# Altium PCB V3_Board.PcbDoc (part 5 of 7)
Units mil, origin at the board's own origin, x right, y up, seen from the top; angles counter-clockwise.
Board outline 6915 x 4422 mil, 2 copper layers (Top Layer, Bottom Layer), stack 57 mil thick; 364 components, 243 nets, 1048 pads, 599 vias.
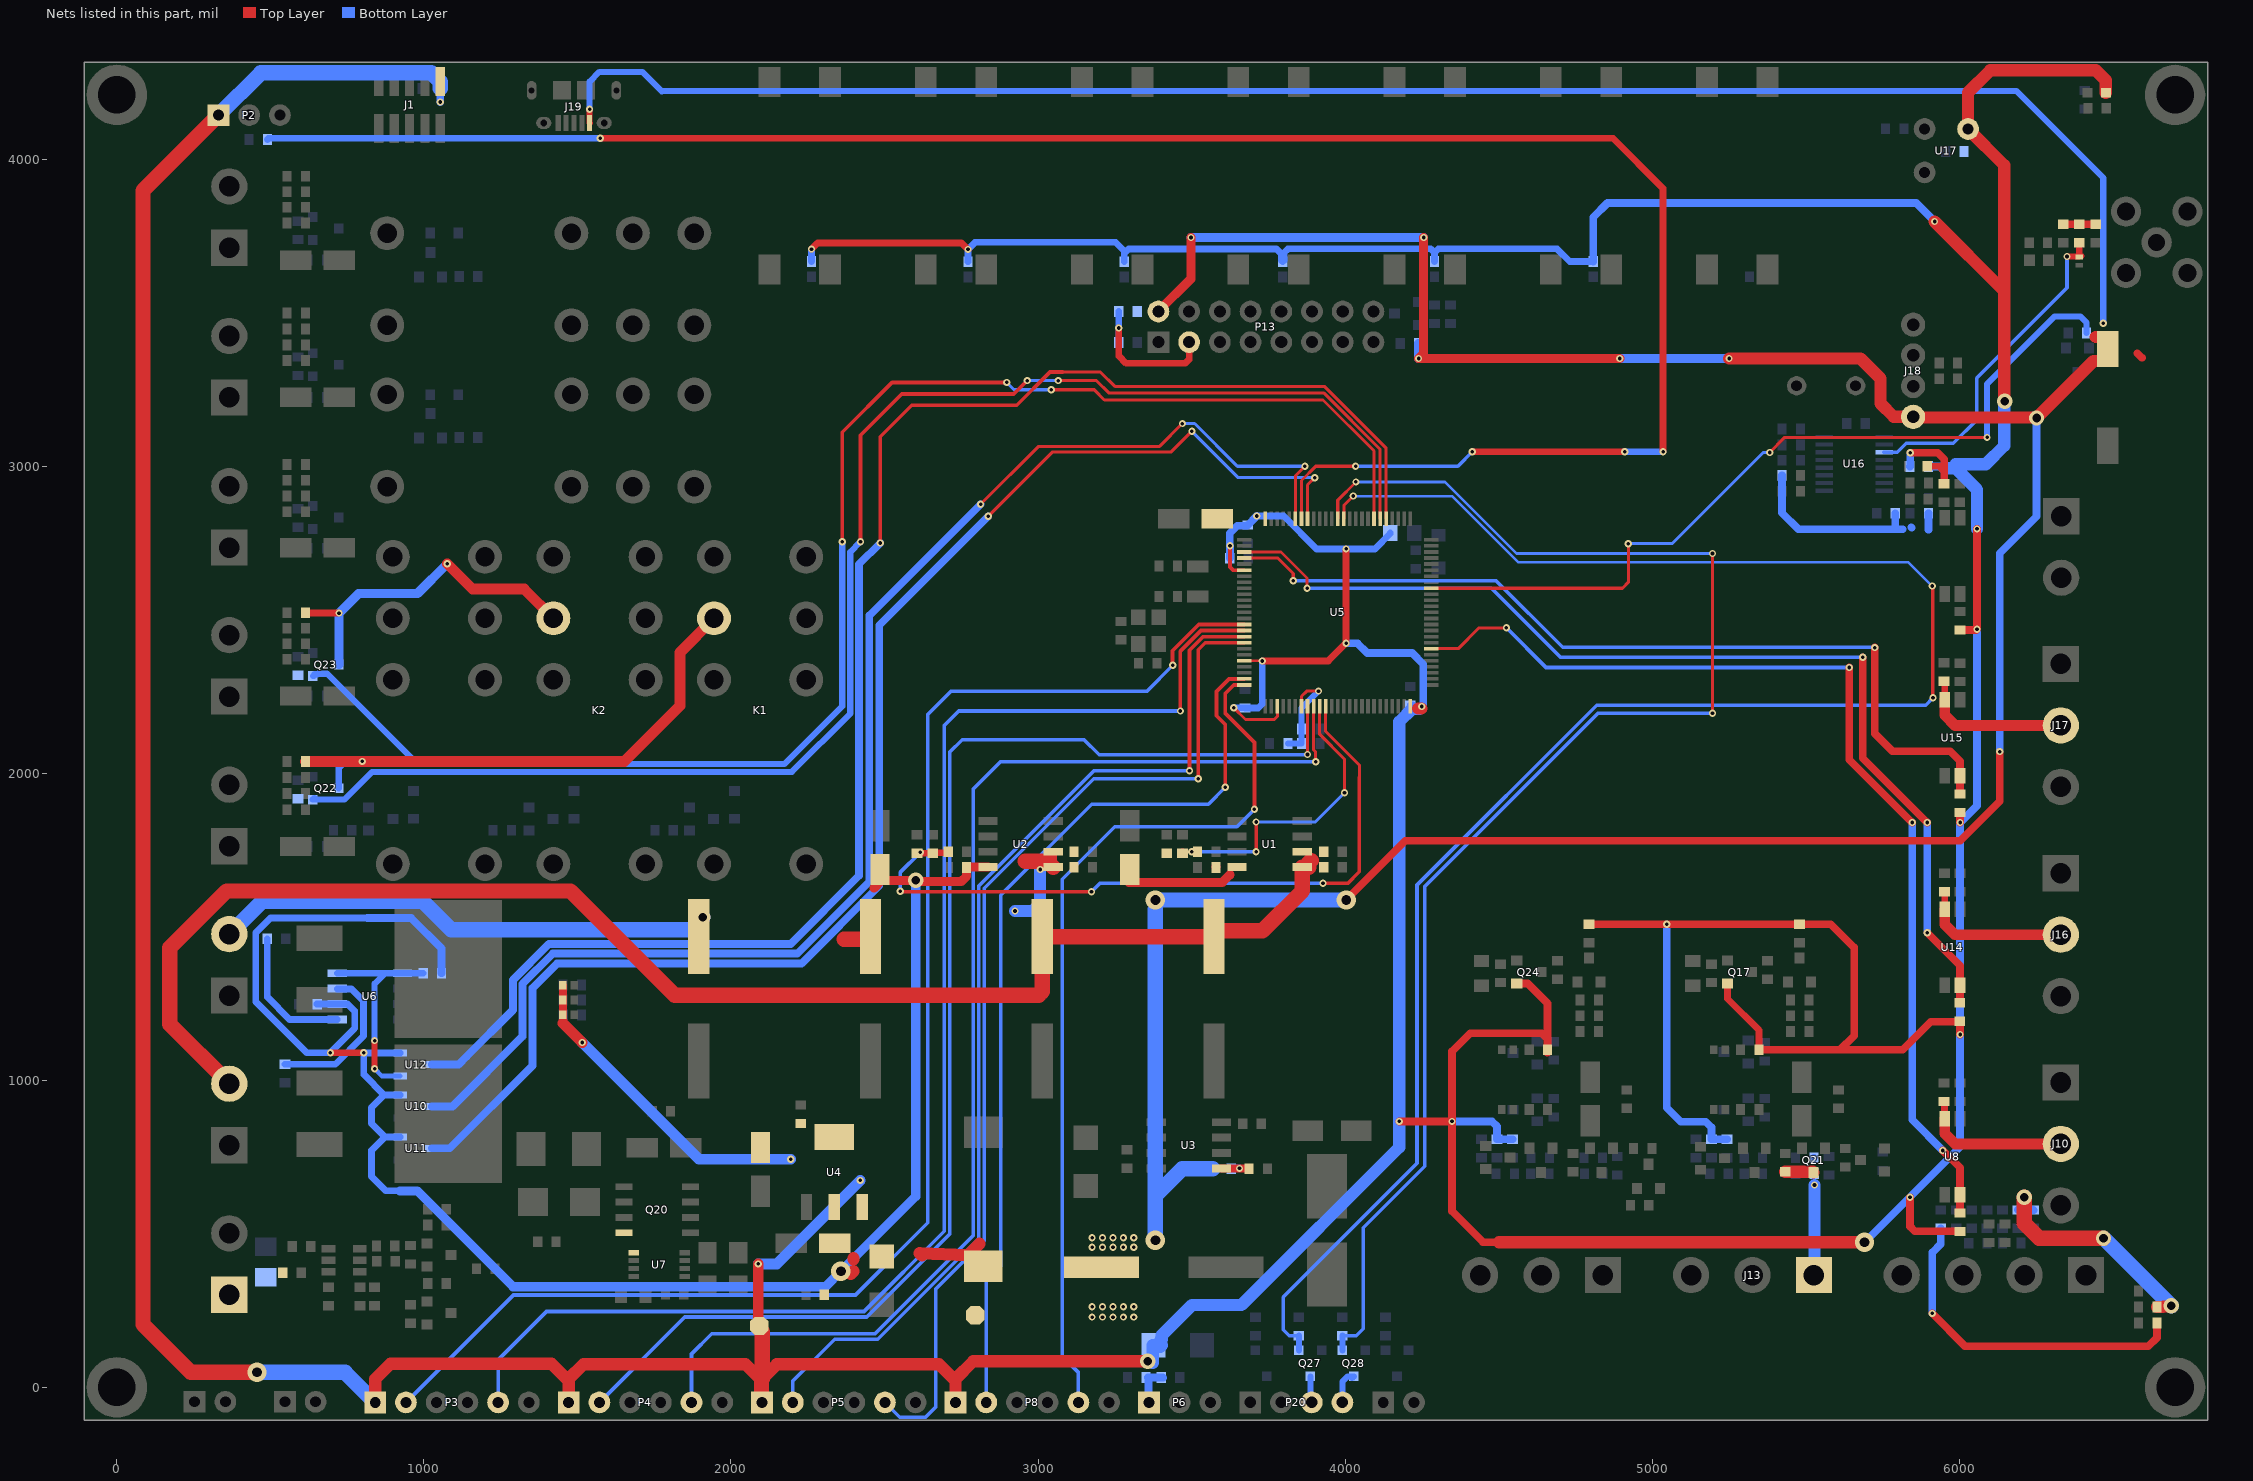
[diagram p2: the nets of this part, all layers, seen from the top]

## Via types
v1: diameter 23.62, hole 11.81, Top Layer to Bottom Layer, 557 vias
v2: diameter 62.99, hole 31.5, Top Layer to Bottom Layer, 31 vias
v3: diameter 50, hole 28, Top Layer to Bottom Layer, 11 vias

## Nets (pads, with @x,y where several pads share a name; then routed paths per layer and width w, separated by ;. In a path a pad name is that pad's centre, name@x,y a point inside that pad or via, vN(x,y) a via of type N, cw(c..) or ccw(c..) an arc to the next point about the centre after c; other vN are vias at no path point) (continued)
3V3: (continued)
  Bottom Layer w25: v1(1054,4186) C51.1@1054,4230 ; P6.1@3357.14,-49.83 3359.64,-47.33 3359.64,31.67 3358.14,33.17 R31.2@3401.14,33.17 3406.14,33.17 R31.2@3407.14,32.17 ; C30.1@3624.46,2700.8 3625,2701.34 v1(3625,2741) ; v1@3624.46,2741 3624.46,2781.46 3649.23,2806.23 3680.15,2806.23 C28.1@3682.46,2808.54 ; C28.1@3682.54,2808.54 v1(3712,2838) ; v1(4003,2424) 4039.87,2424 4071.87,2392 4218,2392 4254.5,2355.5 4254.5,2223.5 v1(4249,2218) ; v1(4348,867) 4477.86,867 4494.5,850.36 C49.1@4494.5,809 R45.2@4545,809 ; R66.2@4807.74,3666.9 4807.74,3669.15 4807.74,3810.74 4854,3857 5859,3857 v1(5919,3797) ; v1(5047,1509) 5047,912 5093,866 5174,866 5192.5,847.5 C48.1@5192.5,809 R43.2@5243,809 ; R104.2@5422,2971 R104.2@5422,2969.67 5422,2849 5476,2795 5815,2795 ; v2(5691,474) 6002,785 v1(6002,1150) v1(6002,1840) 6057,1895 v1(6057,2469) ; 5791,2796 R55.2@5791,2847 ; 5843.5,2801 5845,2799.5 ; 5899,2793 C75.2@5899,2847 ; R54.2@5899,2999 5952.5,2999
  Bottom Layer w35: v1(1516,1124) 1896,744 v1(2195,744) ; v1(2089,403) 2149,403 v1(2421,675)
  Bottom Layer w40: v3@3373.64,81.17 3373.64,138.17 D3.2@3376.4,138.17 D3.2@3380.64,138.17 ; D3.2@3398.01,133.78 D3.2@3402.4,138.17 ; D3.2@3399.64,157.17 3403.14,157.17 3403.14,171.14 3501.12,269.12 3662.12,269.12 4176,783 v1(4176,867) 4176,2168.34 4217.66,2210 v1@4241,2210 ; 5952.5,2994 5987,2994 6057,2924 v1(6057,2796) ; 5987,3007 6086,3007 6146,3067 v3@6146,3212
  Bottom Layer w50: P2.1@331.83,4143.14 469.69,4281 1024.71,4281 1054,4251.71 C51.1@1054,4230 ; v2(457,50) 744.31,50 P3.1@842.14,-47.83
  other v3: 6147,3212
3V3#: C50.1 R54.1 SB17.1 | length 306.2
  Top Layer w22: SB17.1@5895,3000 5933,3000 5950,2983
  Top Layer w25: v1(5840,3044) 5929,3044 5950,3023 5950,2983 C50.1@5950,2943
  Bottom Layer w25: R54.1@5839,2999 5840,3000 v1(5840,3044)
4-20mA: R103.1 R110.1 SB35.1 | length 822.5
  Top Layer w39.37: SB35.1@6643,263 6662.68,263 6664.65,264.97 6686.97,264.97 v3(6689,267)
  Top Layer w50: v3(6211,620) 6211,535 6259,487 v3(6469,487)
  Bottom Layer w25: v3@6211,619.23 6211,599.33 6195.67,584 6195.67,581.5 6193.17,579 R110.1@6190.67,579 6191.17,578.5 6240.5,578.5 R103.1@6241,578
  Bottom Layer w50: v3(6469,487) v3(6689,267)
5V: C4.1 C6.1 C16.1 C17.1 C18.1 C21.1 C22.1 C55.1 D2.1 J18.4 J19.1 L2.2 LS1.1 P7.1 P13.2 R1.1 R57.2 R58.1 R85.2 U1.8 U2.8 U4.3 U6.6 U10.5 U11.5 U12.5 | length 21732.8
  Top Layer w20: v1(1540,4162) 1540,4118.09 J19.1@1540.39,4117.7
  Top Layer w22: v1(696.14,1090.17) v1(805.14,1090.17)
  Top Layer w25: v2(4003,1588) 4196,1781 6003,1781 6131,1909 v1(6131,2071) ; 6579,3368 6594,3353
  Top Layer w29.53: 2466,1627 2491,1652 v3(2602,1652) 2605.92,1648.08 2749.99,1648.08 2767.29,1665.38 2767.29,1693.66 C18.1@2767.52,1693.89 ; C18.1@2768.76,1694.89 U2.8@2836.93,1694.89 ; C4.1@3296,1645 3599.74,1645 3624.74,1670 ; C4.1@3298.52,1687.24 3298.52,1667.56 C4.1@3315.26,1650.83 ; P13.2@3392,3504 3498,3610 v1(3498,3745) ; C6.1@3579.52,1694.66 C6.1@3579.76,1694.89 ; v1(4255.49,3744.7) 4255.49,3367.49 v1(4239,3351) v1(4894,3351)
  Top Layer w40: 2390.14,370.17 2399.14,379.17 ; 2399.14,418.17 2399.14,421.17 ; 2622.2,430.51 2615.31,437.4 2771.93,431.49 2809.33,468.9 ; v1(5250,3351) 5678,3351 5743,3286 5743,3204 5786,3161 J18.4@5849,3161 ; J18.4@5850,3160 5851.09,3158.91 6249.09,3158.91 v3(6251,3157) ; v3@6252.91,3158.91 6436.6,3342.6 6467.71,3342.6 6483.14,3358.03 LS1.1@6483.14,3381.65 6483.14,3405.27 6467.71,3420.71 6444.09,3420.71
  Bottom Layer w20: v1(1540,4162) 1540,4252 1572,4284 1712,4284 1774.77,4221.23 ; 1775,4221 1774.77,4221.23 ; v1(6468,3466) 6468,3939 6185.77,4221.23 1774.77,4221.23
  Bottom Layer w22: C55.1@651.54,1249.17 U6.6@718.54,1249.17 752.14,1249.17 775.14,1226.17 775.14,1170.17 v1@696.64,1091.67 ; v1(696.14,1090.17) 619.83,1090.17 453,1257 453,1481 501,1529 817,1529 ; v1(805.14,1090.17) v1@805.14,1089.57 ; 923,641 877,641 830,688 830,772.83 873.74,816.57 ; U11.5@923.96,816.57 873.74,816.57 ; U10.5@923.96,953.07 871.14,953.07 ; U12.5@923.96,1089.57 v1@805.14,1089.57 ; v1@805.14,1089.57 805.14,1019.07 871.14,953.07 ; 871.14,953.07 830.14,912.07 830.14,860.17 873.74,816.57
  Bottom Layer w25: 817,1529 959,1529 1058.14,1429.86 R85.2@1058.14,1349.17 ; v1(6131,2071) 6131,2717 6251,2837 v3(6251,3157)
  Bottom Layer w29.53: 923,641 979,641 1291.24,328.76 2308.06,328.76 v2(2358.29,379) 2602,622.71 v3(2602,1652) ; v1(3498,3745) 4255.19,3745 v1(4255.49,3744.7) ; v1(4239,3351) R57.2@4239,3400 ; v1(4894,3351) v1(5250,3351)
  Bottom Layer w50: v2(3382.22,480) 3382.22,625.22 ; v2@3382.22,1557 3382.22,625.22 ; v2(3382.22,1588) v2(4003,1588) ; R1.1@3569,713 3470,713 3382.22,625.22
  other v1: 3176,230 3210,230 3244,230 3278,230 3312,230 3176,264 3210,264 3244,264 3278,264 3312,264 3176,457 3210,457 3244,457 3278,457 3312,457 3176,488 3210,488 3244,488 3278,488 3312,488
_ADC: C36.1 R12.2 R13.2 U5.32 | length 331.9
  Top Layer w10: U5.32@3857.76,2219.04 3857.76,2250.76 3875,2268 v1(3913,2268)
  Bottom Layer w20: R12.2@3814,2097 C36.1@3858,2097 3858,2213 v1(3913,2268)
ADC_14: P4.2 U5.33 | length 4296.7
  Top Layer w10: v1(3877.44,2061.62) U5.33@3877.44,2219.04
  Bottom Layer w12: P4.2@1571.89,-47.83 1849.72,230 2442.71,230 2713,500.29 2713,2070 2753,2110 3150,2110 3199.38,2060.62 v1@3877.44,2060.62
ADC_15: P4.5 U5.34 | length 4023.8
  Top Layer w10: U5.34@3897.13,2219.04 3897.13,2076.87 3904,2070 v1(3904,2037.81)
  Bottom Layer w12: P4.5@1871.89,-47.83 1871.89,109.89 1938,176 2469.32,176 2789,495.68 2789,1949 2877.81,2037.81 v1(3904,2037.81)
AN1: P8.2 U5.24 | length 2978.1
  Top Layer w12: v1(3609.84,1955.19) 3609.84,2159.16 3581,2188 3581,2267 3621.62,2307.62 U5.24@3670.75,2307.62
  Bottom Layer w12: P8.2@2831.39,-47.83 2831.39,348.39 2879,396 2879,1603.81 3175.19,1900 3554.65,1900 v1(3609.84,1955.19)
AN2: P8.5 U5.25 | length 2933.6
  Top Layer w12: U5.25@3670.75,2287.94 3636.94,2287.94 3610,2261 3610,2195 3704.5,2100.5 v1(3704.5,1883)
  Bottom Layer w12: P8.5@3131.39,-47.83 3131.39,49.61 3079,102 3079,1655.09 3249.91,1826 3647.5,1826 v1(3704.5,1883)
AN10: P3.2 U5.15 | length 4776.5
  Top Layer w12: v1(3439,2351.81) 3438,2352.81 3438,2399.61 3523.18,2484.79 U5.15@3670.75,2484.79
  Bottom Layer w12: P3.2@942.14,-47.83 1291.97,302 2405.97,302 2641,537.03 2641,2192 2716,2267 3354.19,2267 v1(3439,2351.81)
AN11: P3.5 U5.16 | length 4629.4
  Top Layer w12: v1(3463.5,2203) 3463.5,2398.24 3530.36,2465.1 U5.16@3670.75,2465.1
  Bottom Layer w12: P3.5@1242.14,-47.83 1242.14,90.17 1399.97,248 2433.84,248 2695,509.16 2695,2156 2742,2203 v1(3463.5,2203)
AN12: P5.2 U5.17 | length 3443.9
  Top Layer w12: v1(3493,2009) 3493,2400.87 3537.55,2445.42 U5.17@3670.75,2445.42
  Bottom Layer w12: P5.2@2201.64,-47.83 2201.64,21.67 2337.97,158 2478.19,158 2807,486.81 2807,1633.63 3182.37,2009 v1(3493,2009)
AN13: P5.5 U5.18 | length 3376.2
  Top Layer w12: v1(3521.37,1983) 3521.37,2402.37 3544.73,2425.73 U5.18@3670.75,2425.73
  Bottom Layer w12: P5.5@2501.64,-47.83 2549.81,-96 2634,-96 2667,-63 2667,321.36 2825,479.36 2825,1626.18 3181.82,1983 v1(3521.37,1983)
ANT: C74.1 L3.1 U16.3 | length 1063.8
  Top Layer w20: v1(6350,3683) 6350.61,3682.39 L3.1@6388.19,3682.39 ; 6390,3708 6390,3691 L3.1@6396.58,3684.42
  Bottom Layer w12: U16.3@5754.44,3045.5 5797.5,3045.5 5827,3075 5980,3075 6056,3151 6056,3287 6350,3581 v1(6350,3683)
ANT#: C74.2 SB4.1 SB16.2 | length 106
  Top Layer w25: SB16.2@6338,3788 C74.2@6390,3788 SB4.1@6444,3788
AUTO_FILL: K1.6 Q22.3 SB12.1 | length 1775.5
  Top Layer w35: SB12.1@614.84,2039 v1(799.5,2039) 1653,2039 1834,2220 1834,2394 K1.6@1945,2505
  Bottom Layer w22: Q22.3@723.18,1952.17 723.18,2017.18 745,2039 v1(799.5,2039)
AUTO_FLUSH: K2.6 Q23.3 SB21.1 | length 1114.6
  Top Layer w22: SB21.1@615.84,2522 v1(724,2522)
  Top Layer w35: v1(1077,2683) 1160,2600 1327.25,2600 K2.6@1422.25,2505
  Bottom Layer w22: Q23.3@723.65,2354.4 Q23.3@723.82,2354.58 ; v1@723.82,2521.82 v1(724,2522)
  Bottom Layer w30: Q23.3@723.82,2354.58 v1@723.82,2521.82 ; v1(724,2522) 788,2586 980,2586 v1(1077,2683)
AUX_HEATER: C60.2 J13.1 Q21.3 R67.1 SB8.2 | length 478.4
  Top Layer w25: SB8.2@5434.13,701.87 Q21.3@5525,700.74
  Top Layer w40: SB8.2@5433,703 5522.74,703 Q21.3@5525,700.74
  Bottom Layer w22: J13.1@5526.17,366.64 J13.1@5528,368.46 ; C60.2@5526.17,750.05 C60.2@5526.5,749.72
  Bottom Layer w40: J13.1@5528,368.46 v1(5528,660)
B_CNTRL: Q28.1 R75.1 U5.88 | length 4740.6
  Top Layer w10: U5.88@3975.87,2829.28 3975.87,2889.87 v1(4035,2949) ; v1(5196,2196) v1(5196,2716)
  Bottom Layer w10: v1(4035,2949) 4325,2949 4558,2716 v1(5196,2716)
  Bottom Layer w12: R75.1@3990.73,169.17 4036.17,169.17 4059,192 4059,520.64 4259,720.64 4259,1632 4823,2196 v1(5196,2196)
  Bottom Layer w20: Q28.1@3990.73,121.5 R75.1@3990.73,169.17
B_GND: P20.4 Q28.3 | length 119.6
  Bottom Layer w20: P20.4@3991.14,-47.83 3991.14,19.39 4008.6,36.85 Q28.3@4028.13,36.85 Q28.3@4022.39,31.1
BAT: C2.2 J2.1 SB1.2
BOOT0: R16.1 U5.94 | length 6810.9
  Top Layer w10: U5.94@3857.76,2829.28 3857.76,2953.76 3904,3000 v1(4034,3000)
  Top Layer w22: v1(1575,4067.81) 4872.19,4067.81 5035,3905 v1(5035,3047) ; v1(4414,3047) v1(4910,3047)
  Bottom Layer w12: v1(4034,3000) 4367,3000 v1(4414,3047)
  Bottom Layer w22: R16.1@491,4064 494.81,4067.81 v1@1574.56,4067.81 ; v1(4910,3047) v1(5035,3047)
BUZZER: R62.2 U5.67 | length 2709.7
  Top Layer w10: U5.67@4280.99,2602.9 4902.9,2602.9 4922,2622 v1@4922,2740 ; v1(5382,3045) 5431,3094 v1(6090,3094)
  Bottom Layer w10: v1(4922,2748) 5064,2748 5361,3045 v1(5382,3045)
  Bottom Layer w20: v1(6090,3094) 6090,3268 6310,3488 6394,3488 6413.54,3468.46 6413.54,3434.46 R62.2@6414,3434
CII: R1.2 R2.2 U3.5 | length 117.3
  Top Layer w25: U3.5@3597.59,714.09 3597.89,713.8 3686.2,713.8 R2.2@3687,713
  Bottom Layer w25: R1.2@3629,713 3630,714 v1(3656,714)
CRNT_SNS.IP+_1: C5.1 C7.1 C8.1 C10.1 J3.2 U1.1 U1.2 | length 4788.5
  Top Layer w50: J3.2@366.94,989.62 173,1183.56 173,1432 358.17,1617.17 1477.83,1617.17 1817,1278 3002,1278 3013.89,1289.89 C7.1@3013.89,1468.72 C5.1@3573.22,1468.72 3573.22,1478.3 3582.67,1487.75 3730.75,1487.75 3860.52,1617.52 U1.1@3860.52,1694.89 ; U1.1@3882,1694.89 3882,1709.45 3889,1716.45
  Bottom Layer w22: J3.2@358.69,989.62 J3.2@366.94,989.62
CRNT_SNS.IP+_2: C12.1 C13.1 C14.1 C15.1 J4.2 U2.1 U2.2 | length 2079.6
  Top Layer w25: U2.1@3049.52,1694.89 U2.2@3049.52,1744.89
  Top Layer w50: 2368.5,1459.5 C13.1@2454.56,1459.5 ; 2958.29,1714.51 3029.91,1714.51 U2.1@3049.52,1694.89
  Bottom Layer w39.37: v1(2925,1552) 2983,1552 3007,1576 v1(3007,1687)
  Bottom Layer w50: J4.2@366.94,1476.67 473.27,1583 998,1583 1090,1491 1868,1491 v3(1909,1532)
CRNT_VOUT.VIOUT1: C11.1 R5.1 R7.2 U5.35 | length 952.4
  Top Layer w10: U5.35@3916.81,2219.04 3916.81,2127.19 3998,2046 v1(3998,1937)
  Top Layer w12: v1(3710,1744.89) v1(3710,1842)
  Top Layer w29.53: C11.1@3470.31,1740.11 C11.1@3470.54,1740.35 ; R5.1@3519.52,1742.39 R5.1@3519.52,1744.89
  Bottom Layer w10: v1(3710,1842) 3903,1842 v1(3998,1937)
  Bottom Layer w12: v1(3500.52,1744.89) v1(3710,1744.89)
CRNT_VOUT.VIOUT2: C19.1 R8.1 R10.2 U5.36 | length 2363.8
  Top Layer w10: U5.36@3936.5,2219.04 3936.5,2136.61 4046,2027.11 4046,1988
  Top Layer w12: v1(2551.81,1616) 2552.81,1615 v1(3174.3,1615) ; v1(3928,1642) 4008,1642 4046,1680 4046,1988
  Top Layer w22: R10.2@2606.31,1740.11 C19.1@2657.31,1740.11 2659.14,1741.95 2704.58,1741.95 R8.1@2707.52,1744.89
  Bottom Layer w12: v1(2551.81,1616) 2551,1616.81 2551,1677 v1(2617,1743) ; v1(3174.3,1615) 3201.3,1642 v1(3928,1642)
DIV: P13.3 R58.2 R59.2 | length 492.4
  Top Layer w22: v1(3263,3450) 3263,3359 3287,3335 3479.11,3335 3492,3347.89 P13.3@3492,3404
  Bottom Layer w22: R59.2@3263,3403 R58.2@3263,3504
DRV_OUTA1: R24.2 U6.7 | length 510.1
  Bottom Layer w22: R24.2@548.14,1053.17 712.14,1053.17 804.14,1145.17 804.14,1258.86 764.67,1298.33 719.38,1298.33 U6.7@718.54,1299.17
DRV_OUTB1: R25.2 U6.5 | length 448.2
  Bottom Layer w22: R25.2@490.82,1462.06 490.82,1271.5 563.14,1199.17 U6.5@718.54,1199.17
ENA: U5.80 U12.2 | length 5227.2
  Top Layer w10: 3081,3307 3203,3307 3250,3260 3932,3260 4133.35,3058.65 U5.80@4133.35,2829.28
  Top Layer w12: v1(2486,2750) 2486,3096 2589,3199 2931,3199 3039,3307 3081,3307
  Bottom Layer w25: U12.2@1026.32,1052.17 1113.17,1052.17 1139.59,1078.59 1290.68,1229.68 1290.68,1327.48 1407.7,1444.5 2194.5,1444.5 2417,1667 2417,2681 v1(2486,2750)
ENA#: R85.1 U6.1 U6.8 U12.4 | length 698.2
  Top Layer w20: v1(840.14,1038.17) v1(840.14,1130.17)
  Bottom Layer w15: v1(840.14,1038.17) 863.54,1014.77 U12.4@923.96,1014.77
  Bottom Layer w20: v1(840.14,1130.17) 840.14,1315.14 874.17,1349.17
  Bottom Layer w22: U6.8@718.54,1349.17 874.17,1349.17 U6.1@931.14,1349.17 R85.1@998.14,1349.17
FILL_CNTRL: Q22.1 R69.1 U5.81 | length 4878.4
  Top Layer w10: v1(3066,3279) 3190,3279 3230,3239 3930,3239 4113.66,3055.34 U5.81@4113.66,2829.28
  Top Layer w12: v1(2422,2754) 2422,3101 2556,3235 2920.66,3235 v1(2964.66,3279)
  Bottom Layer w10: v1(2964.66,3279) v1(3066,3279)
  Bottom Layer w20: Q22.1@644.28,1920.51 Q22.1@638.54,1914.76 742,1914.76 832.23,2005 2199,2005 2388.5,2194.5 2388.5,2720.5 v1(2422,2754)
FLOW_MCU1: R76.1 U5.57 U8.4 | length 3358.1
  Top Layer w10: U5.57@4280.99,2406.05 4368.05,2406.05 4436,2474 v1(4525,2474)
  Top Layer w25: v1(5641,2345) 5641,2045 v1(5846,1840) ; v1(5945.58,772.42) 6002,716 U8.4@6002,627.98 R76.1@6002,570
  Bottom Layer w12: v1(4525,2474) 4654,2345 v1@5633,2345
  Bottom Layer w25: v1(5846,1840) 5846,872 v1(5945.58,772.42)
FLOW_MCU2: R35.1 U5.3 U14.4 | length 3433
  Top Layer w10: U5.3@3670.75,2721.01 3790.99,2721.01 3876,2636 v1(3876,2603)
  Top Layer w25: v1(5685,2378) 5685,2050 v1(5895,1840) ; v1(5895,1481) 6002,1374 U14.4@6002,1309.98 R35.1@6002,1252
  Bottom Layer w12: v1(3876,2603) 4476,2603 4701,2378 v1(5685,2378)
  Bottom Layer w25: v1(5895,1481) v1(5895,1840)
FLOW_MCU3: R23.1 U5.4 U15.4 | length 2886.3
  Top Layer w10: U5.4@3670.75,2701.32 3780.68,2701.32 3831,2651 v1(3831,2627.58)
  Top Layer w25: v1(5724,2409.69) 5724,2130 5782,2072 5970,2072 6002,2040 U15.4@6002,1991.98 R23.1@6002,1934
  Bottom Layer w12: v1@3831.58,2627.58 4491.42,2627.58 4708,2411 v1@5722.69,2411
FLOW_OUT1: J10.2 R77.1 U8.2 | length 497
  Top Layer w22: R77.1@5950,932 5951,931 5951,877.02 U8.2@5952,876.02
  Top Layer w35: U8.2@5952,876.02 5952.22,875.8 5952.22,827.78 5986.33,793.67 J10.2@6330,793.67
FLOW_OUT2: J16.2 R36.1 U14.2 | length 497.6
  Top Layer w22: U14.2@5952,1558.02 R36.1@5952,1614
  Top Layer w35: U14.2@5952.22,1558.47 5952.22,1508.45 5985.67,1475 J16.2@6330,1475
FLOW_OUT3: J17.2 R38.1 U15.2 | length 497.9
  Top Layer w22: U15.2@5952,2240.02 R38.1@5952,2296
  Top Layer w35: U15.2@5952,2240.02 5952.22,2239.8 5952.22,2189.78 5985.67,2156.33 J17.2@6330,2156.33
FLUSH_CNTRL: Q23.1 R70.1 U5.82 | length 4932.4
  Top Layer w10: v1(3043,3249) 3183,3249 3216,3216 3928,3216 4093.98,3050.02 U5.82@4093.98,2829.28
  Top Layer w12: v1(2363,2754) 2363,3111 2525,3273 v1(2898,3273)
  Bottom Layer w10: v1(2898,3273) 2922,3249 v1(3043,3249)
  Bottom Layer w20: Q23.1@639,2317 643.35,2317 643.35,2321.35 644.75,2322.75 654.56,2322.75 656.46,2324.65 685.35,2324.65 979,2031 2175,2031 2362.5,2218.5 2362.5,2753.5 v1(2363,2754)
G_CNTRL: Q27.1 R74.1 U5.87 | length 6133.5
  Top Layer w10: U5.87@3995.55,2829.28 3995.55,2872.55 v1(4026,2903)
  Top Layer w12: v1@5912.5,2610 5912.5,2247.5 v1(5914,2246)
  Bottom Layer w8: v1(4026,2903) 4348,2903 4563,2688 5833,2688 v1(5911,2610) v1@5911,2601.84
  Bottom Layer w12: R74.1@3849.23,169.17 3817.79,169.17 3798,188.97 3798,295 4234,731 4234,1637 4819,2222 5890,2222 v1(5914,2246)
  Bottom Layer w20: Q27.1@3849.23,121.5 R74.1@3849.23,169.17
G_GND: P20.3 Q27.3 | length 86.5
  Bottom Layer w20: Q27.3@3886.63,36.85 3886.63,-43.32 P20.3@3891.14,-47.83
GATE: Q20.4 U7.1
GATE_DRV.INA_1: U5.95 U10.2 | length 4612.2
  Top Layer w10: v1(2813,2876) 3002,3065 3396,3065 v1(3470,3139) ; U5.95@3838.07,2829.28 3838.04,2829.31 3838.04,2969.04 v1(3869,3000)
  Bottom Layer w10: v1(3470,3139) 3510,3139 3649,3000 v1(3869,3000)
  Bottom Layer w25: U10.2@1026.32,915.67 1093.67,915.67 1321.68,1143.68 1321.68,1314.64 1420.54,1413.5 2216.54,1413.5 2451,1647.96 2451,2514 v1(2813,2876)
GATE_DRV.INB_1: U5.93 U11.2 | length 4692.8
  Top Layer w10: v1(2838,2837) 3048,3047 3434,3047 v1(3501,3114) ; U5.93@3877.44,2829.28 3877.44,2939.44 v1(3901,2963)
  Bottom Layer w10: v1(3501,3114) 3652,2963 v1(3901,2963)
  Bottom Layer w25: U11.2@1026.32,779.17 1085.17,779.17 1354.18,1048.18 1354.18,1301.18 1434,1381 2230,1381 2483,1634 2483,2482 v1(2838,2837)